# Altium PCB ISL6236A_DEMO_PCB_V1I1.PcbDoc (part 2 of 3)
Units mm, origin at the board's own origin, x right, y up, seen from the top; angles counter-clockwise.
Board outline 50 x 50 mm, 6 copper layers (L1, L2, L3, L4, L5, L6), stack 0.816 mm thick; 41 components, 27 nets, 119 pads, 41 vias.
Unrouted connection lines stored in the file: 91.
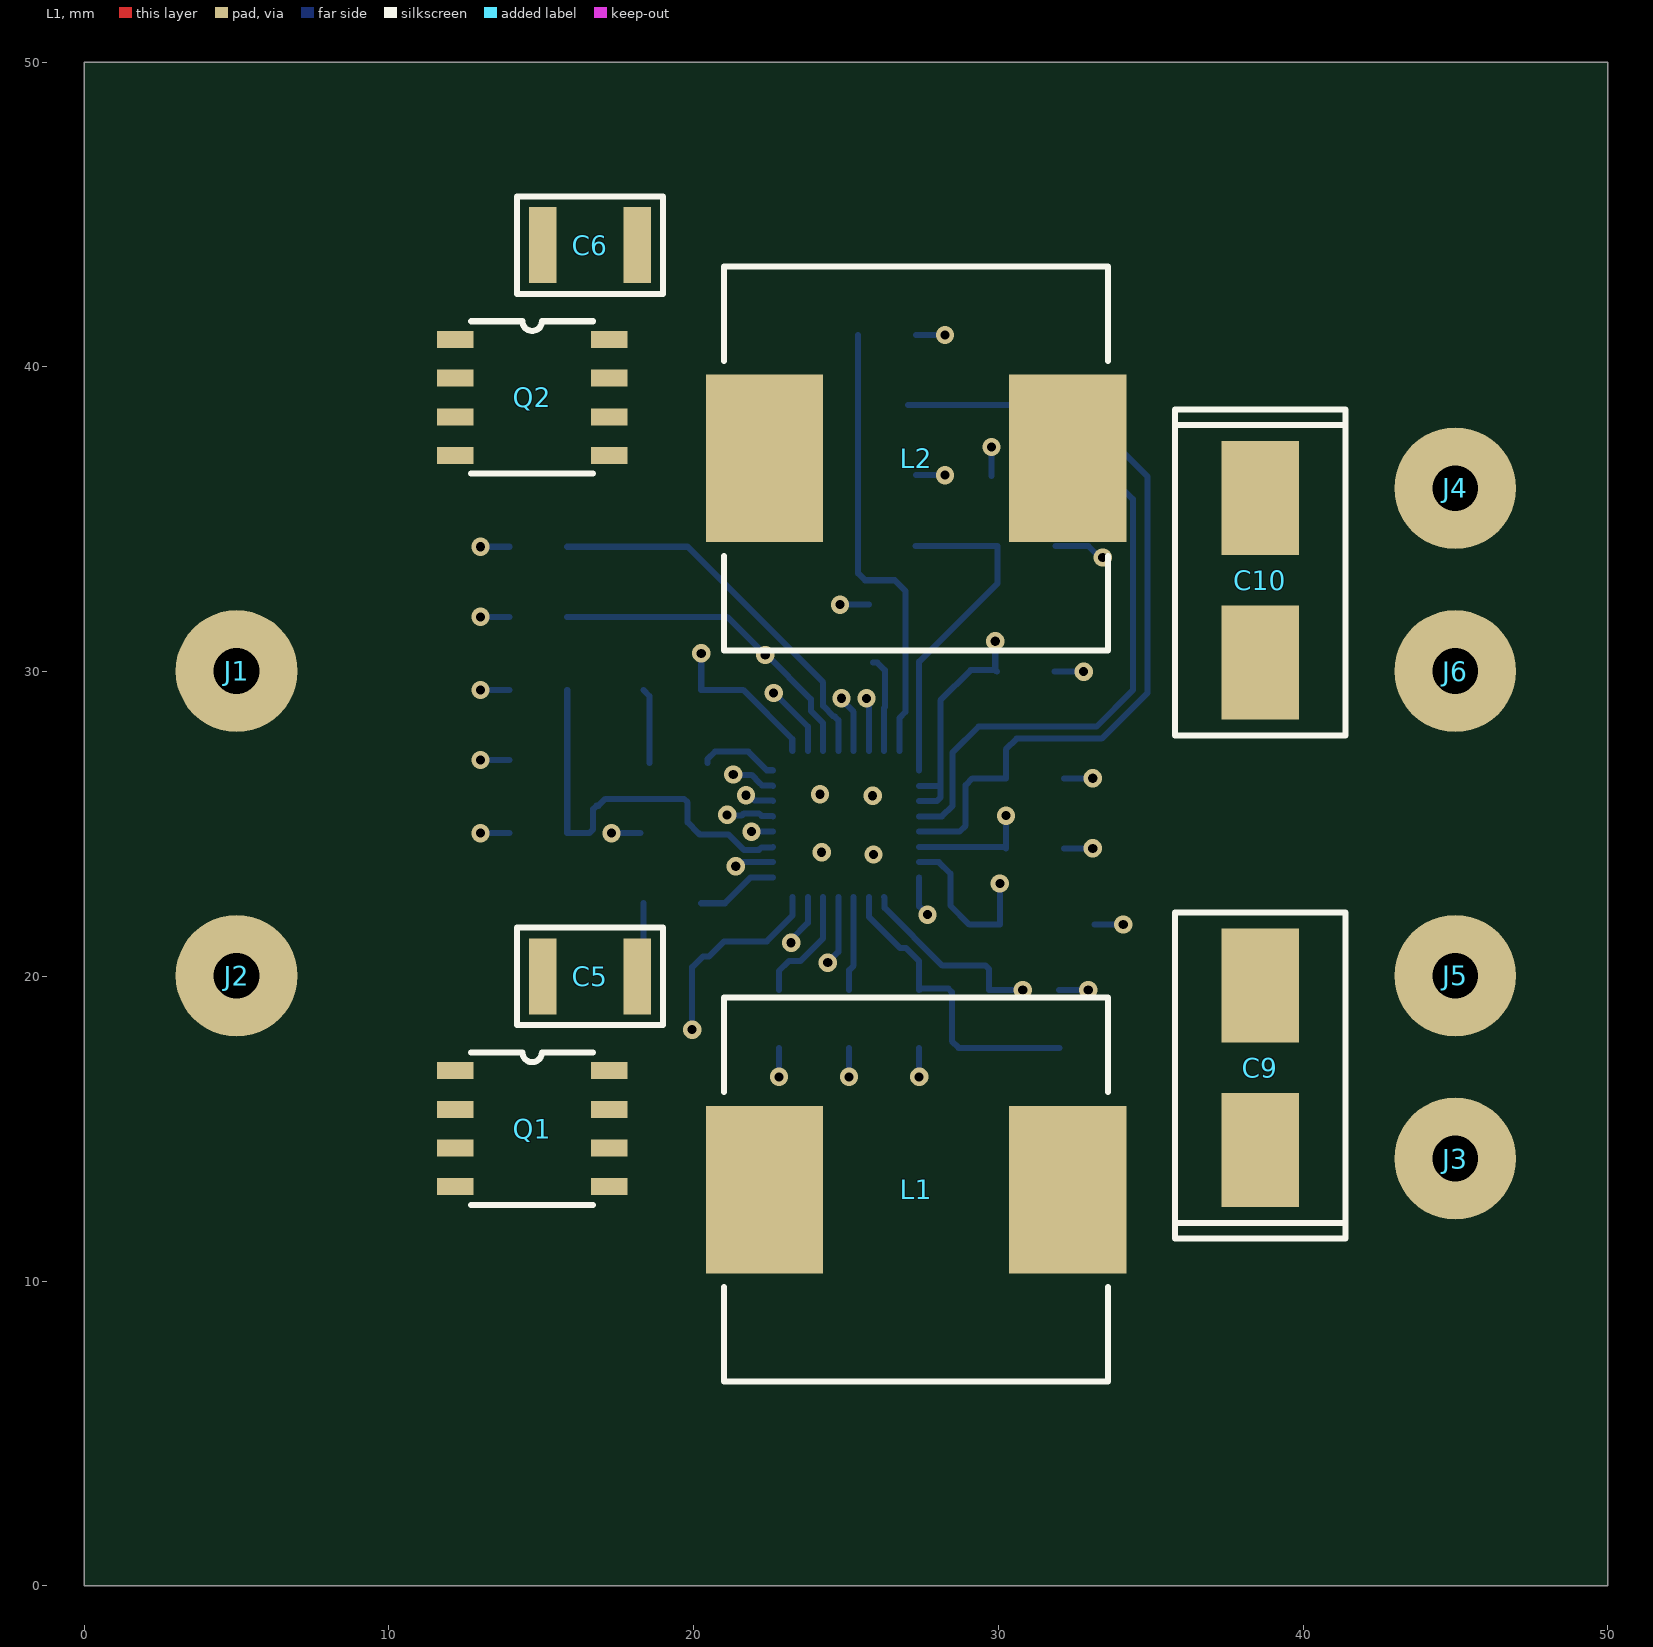
[diagram p0: L1 view]

## Part data (continued)
C11: library part C0805C103K5RACTU, "Multilayer Ceramic Capacitors Mlcc - Smd/Smt 50V 0.01Uf X7R 0805 10%", Case Code (Imperial)=0805, Dielectric=X7R, Dielectric Material=Ceramic, Manufacturer="Yageo Group", Max Operating Temperature=125°C, Min Operating Temperature=-55°C, Supplier Part Number=399-C0805C103K5RACTUCT-ND, Temperature Coefficient=30ppm/°C, Tolerance=10%, Voltage=50V, Case/Package=0805, Category="Ceramic Capacitors", China RoHS=Compliant, ComponentLink1Description=https://datasheet.octopart.com:443/C0805C103K5RACTU-KEMET-datasheet-178445679.pdf?src-supplier=Farnell, ComponentLink1URL=https://datasheet.octopart.com:443/C0805C103K5RACTU-KEMET-datasheet-178445679.pdf?src-supplier=Farnell, ComponentLink2Description=https://datasheet.octopart.com:443/C0805C103K5RACTU-KEMET-datasheet-137357759.pdf?src-supplier=Farnell, ComponentLink2URL=https://datasheet.octopart.com:443/C0805C103K5RACTU-KEMET-datasheet-137357759.pdf?src-supplier=Farnell, ComponentLink3Description=https://datasheet.octopart.com:443/C0805C103K5RACTU-KEMET-datasheet-101576077.pdf?src-supplier=Farnell, ComponentLink3URL=https://datasheet.octopart.com:443/C0805C103K5RACTU-KEMET-datasheet-101576077.pdf?src-supplier=Farnell, ComponentLink4Description=https://datasheet.octopart.com:443/C0805C103K5RACTU-KEMET-datasheet-176142291.pdf?src-supplier=Farnell, ComponentLink4URL=https://datasheet.octopart.com:443/C0805C103K5RACTU-KEMET-datasheet-176142291.pdf?src-supplier=Farnell, ComponentLink5Description=https://datasheet.octopart.com:443/C0805C103K5RAC-TU-Kemet-datasheet-7833651.pdf?src-supplier=Farnell, ComponentLink5URL=https://datasheet.octopart.com:443/C0805C103K5RAC-TU-Kemet-datasheet-7833651.pdf?src-supplier=Farnell, ComponentLink6Description=https://datasheet.octopart.com:443/C0805C103K5RAC-TU-Kemet-datasheet-7601896.pdf?src-supplier=Farnell, ComponentLink6URL=https://datasheet.octopart.com:443/C0805C103K5RAC-TU-Kemet-datasheet-7601896.pdf?src-supplier=Farnell, ComponentLink7Description=https://datasheet.octopart.com:443/C0805C103K5RAC-TU-Kemet-datasheet-5316294.pdf?src-supplier=Farnell, ComponentLink7URL=https://datasheet.octopart.com:443/C0805C103K5RAC-TU-Kemet-datasheet-5316294.pdf?src-supplier=Farnell, ComponentLink8Description=https://datasheet.octopart.com:443/C0805C103K5RAC-TU-Kemet-datasheet-5314837.pdf?src-supplier=Farnell, ComponentLink8URL=https://datasheet.octopart.com:443/C0805C103K5RAC-TU-Kemet-datasheet-5314837.pdf?src-supplier=Farnell, ComponentLink9Description=https://datasheet.octopart.com:443/C0805C103K5RAC-TU-Kemet-datasheet-8092359.pdf?src-supplier=Farnell, ComponentLink9URL=https://datasheet.octopart.com:443/C0805C103K5RAC-TU-Kemet-datasheet-8092359.pdf?src-supplier=Farnell, ComponentLink10Description=https://datasheet.octopart.com:443/C0805C103K5RAC-TU-Kemet-datasheet-5314449.pdf?src-supplier=Farnell, ComponentLink10URL=https://datasheet.octopart.com:443/C0805C103K5RAC-TU-Kemet-datasheet-5314449.pdf?src-supplier=Farnell, ComponentLink11Description=https://datasheet.octopart.com:443/C0805C103K5RACTU-Kemet-datasheet-5314969.pdf?src-supplier=Farnell, ComponentLink11URL=https://datasheet.octopart.com:443/C0805C103K5RACTU-Kemet-datasheet-5314969.pdf?src-supplier=Farnell, ComponentLink12Description=https://datasheet.octopart.com:443/C0805C103K5RAC-TU-Kemet-datasheet-5314627.pdf?src-supplier=Farnell, ComponentLink12URL=https://datasheet.octopart.com:443/C0805C103K5RAC-TU-Kemet-datasheet-5314627.pdf?src-supplier=Farnell, ComponentLink13Description=https://datasheet.octopart.com:443/C0805C103K5RAC-TU-Kemet-datasheet-5389132.pdf?src-supplier=Farnell, ComponentLink13URL=https://datasheet.octopart.com:443/C0805C103K5RAC-TU-Kemet-datasheet-5389132.pdf?src-supplier=Farnell, ComponentLink14Description=https://datasheet.octopart.com:443/C0805C103K5RAC-TU-Kemet-datasheet-5313836.pdf?src-supplier=Farnell, ComponentLink14URL=https://datasheet.octopart.com:443/C0805C103K5RAC-TU-Kemet-datasheet-5313836.pdf?src-supplier=Farnell, ComponentLink15Description=https://datasheet.octopart.com:443/C0805C103K5RAC-TU-Kemet-datasheet-8111010.pdf?src-supplier=Farnell, ComponentLink15URL=https://datasheet.octopart.com:443/C0805C103K5RAC-TU-Kemet-datasheet-8111010.pdf?src-supplier=Farnell, ComponentLink16Description=https://datasheet.octopart.com:443/C0805C103K5RAC-TU-Kemet-datasheet-7627733.pdf?src-supplier=Farnell, ComponentLink16URL=https://datasheet.octopart.com:443/C0805C103K5RAC-TU-Kemet-datasheet-7627733.pdf?src-supplier=Farnell, ComponentLink17Description=https://datasheet.octopart.com:443/C0805C103K5RACTU-Kemet-datasheet-500041.pdf?src-supplier=Farnell, ComponentLink17URL=https://datasheet.octopart.com:443/C0805C103K5RACTU-Kemet-datasheet-500041.pdf?src-supplier=Farnell, ComponentLink18Description=https://datasheet.octopart.com:443/C0805C103K5RAC-TU-Kemet-datasheet-5315946.pdf?src-supplier=Farnell, ComponentLink18URL=https://datasheet.octopart.com:443/C0805C103K5RAC-TU-Kemet-datasheet-5315946.pdf?src-supplier=Farnell, ComponentLink19Description=https://datasheet.octopart.com:443/C0805C103K5RACTU-KEMET-datasheet-182041101.pdf?src-supplier=IHS, ComponentLink19URL=https://datasheet.octopart.com:443/C0805C103K5RACTU-KEMET-datasheet-182041101.pdf?src-supplier=IHS, ComponentLink20Description=https://datasheet.octopart.com:443/C0805C103K5RACTU-KEMET-datasheet-68331921.pdf?src-supplier=Upverter, ComponentLink20URL=https://datasheet.octopart.com:443/C0805C103K5RACTU-KEMET-datasheet-68331921.pdf?src-supplier=Upverter, ComponentLink21Description=https://datasheet.octopart.com:443/C0805C103K5RAC-TU-Kemet-datasheet-5313890.pdf?src-supplier=Newark, ComponentLink21URL=https://datasheet.octopart.com:443/C0805C103K5RAC-TU-Kemet-datasheet-5313890.pdf?src-supplier=Newark, ComponentLink22Description=https://datasheet.octopart.com:443/C0805C103K5RACTU-KEMET-datasheet-130256537.pdf?src-supplier=Newark, ComponentLink22URL=https://datasheet.octopart.com:443/C0805C103K5RACTU-KEMET-datasheet-130256537.pdf?src-supplier=Newark, ComponentLink23Description=https://datasheet.octopart.com:443/C0805C103K5RAC-TU-Kemet-datasheet-5390537.pdf?src-supplier=Newark, ComponentLink23URL=https://datasheet.octopart.com:443/C0805C103K5RAC-TU-Kemet-datasheet-5390537.pdf?src-supplier=Newark, ComponentLink24Description=https://datasheet.octopart.com:443/C0805C103K5RAC-TU-Kemet-datasheet-7541751.pdf?src-supplier=Newark, ComponentLink24URL=https://datasheet.octopart.com:443/C0805C103K5RAC-TU-Kemet-datasheet-7541751.pdf?src-supplier=Newark, ComponentLink25Description=https://datasheet.octopart.com:443/C0805C103K5RACTU-KEMET-datasheet-176142293.pdf?src-supplier=Newark, ComponentLink25URL=https://datasheet.octopart.com:443/C0805C103K5RACTU-KEMET-datasheet-176142293.pdf?src-supplier=Newark, ComponentLink26Description=https://datasheet.octopart.com:443/C0805C103K5RACTU-Kemet-datasheet-27203261.pdf?src-supplier=Newark, ComponentLink26URL=https://datasheet.octopart.com:443/C0805C103K5RACTU-Kemet-datasheet-27203261.pdf?src-supplier=Newark, ComponentLink27Description=https://datasheet.octopart.com:443/C0805C103K5RACTU-Kemet-datasheet-8764837.pdf?src-supplier=Newark, ComponentLink27URL=https://datasheet.octopart.com:443/C0805C103K5RACTU-Kemet-datasheet-8764837.pdf?src-supplier=Newark, ComponentLink28Description=https://datasheet.octopart.com:443/C0805C103K5RACTU-Kemet-datasheet-8480123.pdf?src-supplier=Newark, ComponentLink28URL=https://datasheet.octopart.com:443/C0805C103K5RACTU-Kemet-datasheet-8480123.pdf?src-supplier=Newark, ComponentLink29Description=https://datasheet.octopart.com:443/C0805C103K5RACTU-Kemet-datasheet-5393970.pdf?src-supplier=Newark, ComponentLink29URL=https://datasheet.octopart.com:443/C0805C103K5RACTU-Kemet-datasheet-5393970.pdf?src-supplier=Newark, ComponentLink30Description=https://datasheet.octopart.com:443/C0805C103K5RACTU-Kemet-datasheet-8502025.pdf?src-supplier=Newark, ComponentLink30URL=https://datasheet.octopart.com:443/C0805C103K5RACTU-Kemet-datasheet-8502025.pdf?src-supplier=Newark, ComponentLink31Description=https://datasheet.octopart.com:443/C0805C103K5RACTU-Kemet-datasheet-161801.pdf?src-supplier=Newark, ComponentLink31URL=https://datasheet.octopart.com:443/C0805C103K5RACTU-Kemet-datasheet-161801.pdf?src-supplier=Newark, ComponentLink32Description=https://datasheet.octopart.com:443/C0805C103K5RAC7800-KEMET-datasheet-37550250.pdf?src-supplier=Electro+Sonic, ComponentLink32URL=https://datasheet.octopart.com:443/C0805C103K5RAC7800-KEMET-datasheet-37550250.pdf?src-supplier=Electro+Sonic, ComponentLink33Description=https://datasheet.octopart.com:443/C0805C103K5RACTU-KEMET-datasheet-32036385.pdf?src-supplier=Electro+Sonic, ComponentLink33URL=https://datasheet.octopart.com:443/C0805C103K5RACTU-KEMET-datasheet-32036385.pdf?src-supplier=Electro+Sonic, ComponentLink34Description=https://datasheet.octopart.com:443/C0805C103K5RAC7800-KEMET-datasheet-188512054.pdf?src-supplier=ODG+(Origin+Data+Global), ComponentLink34URL=https://datasheet.octopart.com:443/C0805C103K5RAC7800-KEMET-datasheet-188512054.pdf?src-supplier=ODG+(Origin+Data+Global), ComponentLink35Description=https://datasheet.octopart.com:443/C0805C103K5RACTU-KEMET-datasheet-178249621.pdf?src-supplier=Master+Electronics, ComponentLink35URL=https://datasheet.octopart.com:443/C0805C103K5RACTU-KEMET-datasheet-178249621.pdf?src-supplier=Master+Electronics, ComponentLink36Description=https://datasheet.octopart.com:443/C0805C103K5RACTU-KEMET-datasheet-164512540.pdf?src-supplier=TME, ComponentLink36URL=https://datasheet.octopart.com:443/C0805C103K5RACTU-KEMET-datasheet-164512540.pdf?src-supplier=TME, ComponentLink37Description=https://datasheet.octopart.com:443/C0805C103K5RACTU-KEMET-datasheet-67847103.pdf?src-supplier=TME, ComponentLink37URL=https://datasheet.octopart.com:443/C0805C103K5RACTU-KEMET-datasheet-67847103.pdf?src-supplier=TME, ComponentLink38Description=https://datasheet.octopart.com:443/C0805C103K5RACTU-KEMET-datasheet-68331906.pdf?src-supplier=TME, ComponentLink38URL=https://datasheet.octopart.com:443/C0805C103K5RACTU-KEMET-datasheet-68331906.pdf?src-supplier=TME, ComponentLink39Description=https://datasheet.octopart.com:443/C0805C103K5RACTU-KEMET-datasheet-110724412.pdf?src-supplier=RS+(Formerly+Allied+Electronics), ComponentLink39URL=https://datasheet.octopart.com:443/C0805C103K5RACTU-KEMET-datasheet-110724412.pdf?src-supplier=RS+(Formerly+Allied+Electronics), ComponentLink40Description=https://datasheet.octopart.com:443/C0805C103K5RACTU-Kemet-datasheet-464.pdf?src-supplier=RS+(Formerly+Allied+Electronics), ComponentLink40URL=https://datasheet.octopart.com:443/C0805C103K5RACTU-Kemet-datasheet-464.pdf?src-supplier=RS+(Formerly+Allied+Electronics), ComponentLink41Description=https://datasheet.octopart.com/C0805C103K5RACTU-KEMET-datasheet-84169754.pdf, ComponentLink41URL=https://datasheet.octopart.com/C0805C103K5RACTU-KEMET-datasheet-84169754.pdf, ComponentLink42Description=https://datasheet.octopart.com:443/C0805C103K5RACTU-Kemet-datasheet-24570007.pdf?src-supplier=element14+APAC, ComponentLink42URL=https://datasheet.octopart.com:443/C0805C103K5RACTU-Kemet-datasheet-24570007.pdf?src-supplier=element14+APAC, ComponentLink43Description=https://datasheet.octopart.com:443/C0805C103K5RACTU-Kemet-datasheet-22084244.pdf?src-supplier=element14+APAC, ComponentLink43URL=https://datasheet.octopart.com:443/C0805C103K5RACTU-Kemet-datasheet-22084244.pdf?src-supplier=element14+APAC, ComponentLink44Description=https://datasheet.octopart.com:443/C0805C103K5RACTU-Kemet-datasheet-11974838.pdf?src-supplier=Arrow+Electronics, ComponentLink44URL=https://datasheet.octopart.com:443/C0805C103K5RACTU-Kemet-datasheet-11974838.pdf?src-supplier=Arrow+Electronics, ComponentLink45Description=http://sigma.octopart.com:80/conflict_mineral_statement/Yageo-company-3.pdf?src-supplier=Compliance+Statements, ComponentLink45URL=http://sigma.octopart.com:80/conflict_mineral_statement/Yageo-company-3.pdf?src-supplier=Compliance+Statements, ComponentLink46Description=http://sigma.octopart.com:80/rohs_statement/Yageo-company-2.pdf?src-supplier=Compliance+Statements, ComponentLink46URL=http://sigma.octopart.com:80/rohs_statement/Yageo-company-2.pdf?src-supplier=Compliance+Statements, Country of Origin="Mainland China", Depth=1.25mm, Export Control Classification Number (ECCN) Code=EAR99, Harmonized Tariff Schedule (HTS) Code=8532.24.00.20, Height=780µm, Introduction Date=2012-12-07, Lead Free="Lead Free", Lead Pitch=750µm, Length=2mm, Lifecycle Status=Production, Manufacturer Part Number=C0805C103K5RACTU, Material=Ceramic, Mounting Technology="Surface Mount", Number of Terminals=2, Packaging="Cut Tape", Pins=2, Pricing="1=0.11, 10=0.06, 50=0.0416, 100=0.036, 500=0.02644, 1000=0.02351 (USD)", Radiation Hardening=No, REACH SVHC=Yes, RoHS=Compliant, Schedule B="8532240020, 8532240020|8532240020|8532240020|8532240020|8532240020, 8532240020|8532240020|8532240020|8532240020|8532240020|8532240020, 8532240020|8532240020|8532240020|8532240020|8532240020|8532240020|8532240020", Stock=1722319, Supplier=DigiKey, Termination=SMD/SMT, Thickness=889µm, Voltage Rating=50V, Voltage Rating (AC)=50V, Voltage Rating (DC)=50V, Width=1.25mm
J1 J2 J3 J4 J5 J6: library part PAD_WITH_HOLE_4MM_1MM5, "pad with a hole 4mm x 1.5mm"
L1: library part DR125-3R3-R, "Inductor Power Shielded Drum Core 3.3uH 20% 100KHz Ferrite 9.26A 6.3mOhm DCR T/R", Case/Package=0125, Current Rating=9.26A, DC Resistance (DCR)=6.3mΩ, Inductance Tolerance=20%, Manufacturer=Eaton, Max Operating Temperature=125°C, Min Operating Temperature=-40°C, Saturation Current=12.7A, Self Resonant Frequency=100kHz, Supplier Part Number=513-1529-1-ND, Category="Fixed Inductors", ComponentLink1Description=https://datasheet.octopart.com:443/DR125-3R3-R-Eaton-datasheet-129252529.pdf?src-supplier=Electro+Sonic, ComponentLink1URL=https://datasheet.octopart.com:443/DR125-3R3-R-Eaton-datasheet-129252529.pdf?src-supplier=Electro+Sonic, ComponentLink2Description=https://datasheet.octopart.com:443/DR125-3R3-R-Eaton-datasheet-41175520.pdf?src-supplier=Master+Electronics, ComponentLink2URL=https://datasheet.octopart.com:443/DR125-3R3-R-Eaton-datasheet-41175520.pdf?src-supplier=Master+Electronics, ComponentLink3Description=https://datasheet.octopart.com:443/DR125-3R3-R-Coiltronics-datasheet-8612520.pdf?src-supplier=IHS, ComponentLink3URL=https://datasheet.octopart.com:443/DR125-3R3-R-Coiltronics-datasheet-8612520.pdf?src-supplier=IHS, ComponentLink4Description=https://datasheet.octopart.com:443/DR125-3R3-R-Eaton-datasheet-552538.pdf?src-supplier=Newark, ComponentLink4URL=https://datasheet.octopart.com:443/DR125-3R3-R-Eaton-datasheet-552538.pdf?src-supplier=Newark, ComponentLink5Description=https://datasheet.octopart.com:443/DR125-3R3-R-Coiltronics-datasheet-3395.pdf?src-supplier=Factory+Futures, ComponentLink5URL=https://datasheet.octopart.com:443/DR125-3R3-R-Coiltronics-datasheet-3395.pdf?src-supplier=Factory+Futures, ComponentLink6Description=https://datasheet.octopart.com:443/DR125-3R3-R-Eaton-datasheet-37490916.pdf?src-supplier=RS+(Formerly+Allied+Electronics), ComponentLink6URL=https://datasheet.octopart.com:443/DR125-3R3-R-Eaton-datasheet-37490916.pdf?src-supplier=RS+(Formerly+Allied+Electronics), ComponentLink7Description=https://datasheet.octopart.com:443/DR125-3R3-R-Coiltronics-datasheet-119352.pdf?src-supplier=DigiKey, ComponentLink7URL=https://datasheet.octopart.com:443/DR125-3R3-R-Coiltronics-datasheet-119352.pdf?src-supplier=DigiKey, Composition=Wirewound, Core Material=Ferrite, Country of Origin=Philippines, Depth=12.5mm, Export Control Classification Number (ECCN) Code=EAR99, Harmonized Tariff Schedule (HTS) Code=8504.50.80.00, Height=6mm, Height - Seated (Max)=5.9944mm, Introduction Date=2005-07-20, Lead Free="Lead Free", Length=12.5mm, Lifecycle Status=Production, Manufacturer Part Number=DR125-3R3-R, Max Current Rating=9.26A, Max DC Current=9.26A, Military Standard=Not, Mounting Technology="Surface Mount", Number of Circuits=1, Number of Terminals=2, Pins=2, Pricing="1=0.98, 10=0.803, 100=0.6606 (USD)", Radiation Hardening=No, REACH SVHC=No, RMS Current (Irms)=9.26A, RoHS=Compliant, Schedule B="8504500000, 8504500000|8504500000|8504500000|8504500000|8504500000|8504500000|8504500000|8504500000|8504500000|8504500000|8504500000|8504500000|8504500000|8504500000|8504500000|8504500000|8504500000|8504500000|8504500000|8504500000|8504500000|8504500000|8504500000|85", Shielding=Shielded, Stock=12331, Supplier=DigiKey, Termination=SMD/SMT, Test Frequency=100kHz, Tolerance=20%, Weight=4.082331g, Width=12.5mm
L2: library part DR125-2R2-R, "Inductor Power Shielded Drum Core 2.2uH 20% 100KHz Ferrite 10.9A 4.5mOhm DCR T/R", Case/Package=Nonstandard, Current Rating=10.9A, DC Resistance (DCR)=4.5mΩ, Inductance Tolerance=20%, Manufacturer=Eaton, Max Operating Temperature=125°C, Min Operating Temperature=-40°C, Saturation Current=15A, Self Resonant Frequency=100kHz, Supplier Part Number=513-1662-1-ND, Category="Fixed Inductors", China RoHS=Compliant, ComponentLink1Description=https://datasheet.octopart.com:443/DR125-2R2-R-Eaton-datasheet-129252529.pdf?src-supplier=Electro+Sonic, ComponentLink1URL=https://datasheet.octopart.com:443/DR125-2R2-R-Eaton-datasheet-129252529.pdf?src-supplier=Electro+Sonic, ComponentLink2Description=https://datasheet.octopart.com:443/DR125-2R2-R-Eaton-datasheet-41175520.pdf?src-supplier=Master+Electronics, ComponentLink2URL=https://datasheet.octopart.com:443/DR125-2R2-R-Eaton-datasheet-41175520.pdf?src-supplier=Master+Electronics, ComponentLink3Description=https://datasheet.octopart.com:443/DR125-2R2-R-Coiltronics-datasheet-8612520.pdf?src-supplier=IHS, ComponentLink3URL=https://datasheet.octopart.com:443/DR125-2R2-R-Coiltronics-datasheet-8612520.pdf?src-supplier=IHS, ComponentLink4Description=https://datasheet.octopart.com:443/DR125-2R2-R-Eaton-datasheet-552538.pdf?src-supplier=Newark, ComponentLink4URL=https://datasheet.octopart.com:443/DR125-2R2-R-Eaton-datasheet-552538.pdf?src-supplier=Newark, ComponentLink5Description=https://datasheet.octopart.com:443/DR125-2R2-R-Coiltronics-datasheet-3395.pdf?src-supplier=Factory+Futures, ComponentLink5URL=https://datasheet.octopart.com:443/DR125-2R2-R-Coiltronics-datasheet-3395.pdf?src-supplier=Factory+Futures, ComponentLink6Description=https://datasheet.octopart.com:443/DR125-2R2-R-Eaton-datasheet-37490916.pdf?src-supplier=RS+(Formerly+Allied+Electronics), ComponentLink6URL=https://datasheet.octopart.com:443/DR125-2R2-R-Eaton-datasheet-37490916.pdf?src-supplier=RS+(Formerly+Allied+Electronics), ComponentLink7Description=https://datasheet.octopart.com:443/DR125-2R2-R-Coiltronics-datasheet-119352.pdf?src-supplier=DigiKey, ComponentLink7URL=https://datasheet.octopart.com:443/DR125-2R2-R-Coiltronics-datasheet-119352.pdf?src-supplier=DigiKey, Composition=Wirewound, Core Material=Ferrite, Country of Origin=Philippines, DC Current=10.9A, Depth=12.5mm, Export Control Classification Number (ECCN) Code=EAR99, Harmonized Tariff Schedule (HTS) Code=8504.50.80.00, Height=6mm, Height - Seated (Max)=5.9944mm, Introduction Date=2005-07-20, Lead Free="Lead Free", Length=12.5mm, Lifecycle Status=Production, Manufacturer Part Number=DR125-2R2-R, Max Current Rating=10.9A, Max DC Current=10.9A, Military Standard=Not, Mounting Technology="Surface Mount", Number of Circuits=1, Number of Terminals=2, Packaging="Cut Tape", Pins=2, Pricing="1=0.83, 10=0.685, 100=0.563 (USD)", Radiation Hardening=No, REACH SVHC=No, RMS Current (Irms)=10.9A, RoHS=Compliant, Shielding=Shielded, Stock=226, Supplier=DigiKey, Termination=SMD/SMT, Test Frequency=100kHz, Tolerance=20%, Weight=4.082331g, Width=12.5mm
Q1 Q2: "Transistor MOSFET Array Dual N-CH 30V 5.8A/8.2A 8-Pin SOIC T/R", Case/Package=SO, Continuous Drain Current (ID)=5.8A, Drain to Source Resistance=18.5mΩ, Drain to Source Voltage (Vdss)=30V, Gate to Source Voltage (Vgs)=20V, Manufacturer=Vishay, Max Junction Temperature (Tj)=150°C, Max Power Dissipation=1W, Min Operating Temperature=-55°C, Supplier Part Number=SI4816BDY-T1-E3CT-ND, Threshold Voltage=1V, Category=MOSFETs, China RoHS=Compliant, ComponentLink1Description=https://datasheet.octopart.com:443/SI4816BDY-T1-E3-Vishay-datasheet-181471835.pdf?src-supplier=Farnell, ComponentLink1URL=https://datasheet.octopart.com:443/SI4816BDY-T1-E3-Vishay-datasheet-181471835.pdf?src-supplier=Farnell, ComponentLink2Description=https://datasheet.octopart.com:443/SI4816BDY-T1-E3-Vishay-datasheet-8703106.pdf?src-supplier=element14+APAC, ComponentLink2URL=https://datasheet.octopart.com:443/SI4816BDY-T1-E3-Vishay-datasheet-8703106.pdf?src-supplier=element14+APAC, ComponentLink3Description=https://datasheet.octopart.com:443/SI4816BDY-T1-E3-Vishay-datasheet-11047461.pdf?src-supplier=element14+APAC, ComponentLink3URL=https://datasheet.octopart.com:443/SI4816BDY-T1-E3-Vishay-datasheet-11047461.pdf?src-supplier=element14+APAC, ComponentLink4Description=https://datasheet.octopart.com:443/SI4816BDY-T1-E3-Vishay-datasheet-8332786.pdf?src-supplier=element14+APAC, ComponentLink4URL=https://datasheet.octopart.com:443/SI4816BDY-T1-E3-Vishay-datasheet-8332786.pdf?src-supplier=element14+APAC, ComponentLink5Description=https://datasheet.octopart.com:443/SI4816BDY-T1-E3-Vishay-datasheet-31978687.pdf?src-supplier=element14+APAC, ComponentLink5URL=https://datasheet.octopart.com:443/SI4816BDY-T1-E3-Vishay-datasheet-31978687.pdf?src-supplier=element14+APAC, ComponentLink6Description=https://datasheet.octopart.com:443/SI4816BDY-T1-E3-Vishay-datasheet-181482347.pdf?src-supplier=IHS, ComponentLink6URL=https://datasheet.octopart.com:443/SI4816BDY-T1-E3-Vishay-datasheet-181482347.pdf?src-supplier=IHS, ComponentLink7Description=https://datasheet.octopart.com:443/SI4816BDY-T1-E3-Vishay-datasheet-62318721.pdf?src-supplier=Newark, ComponentLink7URL=https://datasheet.octopart.com:443/SI4816BDY-T1-E3-Vishay-datasheet-62318721.pdf?src-supplier=Newark, ComponentLink8Description=https://datasheet.octopart.com:443/SI4816BDY-T1-E3-Vishay-datasheet-41341409.pdf?src-supplier=Newark, ComponentLink8URL=https://datasheet.octopart.com:443/SI4816BDY-T1-E3-Vishay-datasheet-41341409.pdf?src-supplier=Newark, ComponentLink9Description=https://datasheet.octopart.com:443/SI4816BDY-T1-E3-Vishay-datasheet-141196160.pdf?src-supplier=TME, ComponentLink9URL=https://datasheet.octopart.com:443/SI4816BDY-T1-E3-Vishay-datasheet-141196160.pdf?src-supplier=TME, ComponentLink10Description=https://datasheet.octopart.com:443/SI4816BDY-T1-E3-Vishay-datasheet-14187004.pdf?src-supplier=iiiC, ComponentLink10URL=https://datasheet.octopart.com:443/SI4816BDY-T1-E3-Vishay-datasheet-14187004.pdf?src-supplier=iiiC, ComponentLink11Description=https://datasheet.octopart.com:443/SI4816BDY-T1-E3-Vishay-datasheet-11890201.pdf?src-supplier=Arrow+Electronics, ComponentLink11URL=https://datasheet.octopart.com:443/SI4816BDY-T1-E3-Vishay-datasheet-11890201.pdf?src-supplier=Arrow+Electronics, ComponentLink12Description=http://sigma.octopart.com:80/rohs_statement/Vishay-company-15.pdf?src-supplier=Compliance+Statements, ComponentLink12URL=http://sigma.octopart.com:80/rohs_statement/Vishay-company-15.pdf?src-supplier=Compliance+Statements, Element Configuration=Single, Export Control Classification Number (ECCN) Code=EAR99, Fall Time=9ns, Height=1.75mm, Introduction Date=2004-10-28, Lead Free="Lead Free", Length=5mm, Lifecycle Status=Production, Manufacturer Part Number=SI4816BDY-T1-E3, Max Operating Temperature=150°C, Min Breakdown Voltage=30V, Mounting Technology="Surface Mount", Nominal Vgs=3V, Number of Channels=2, Number of Elements=2, Number of Terminals=8, Pins=8, Pricing="1=2.53, 10=1.627, 100=1.1094, 500=0.88782, 1000=0.81657 (USD)", Radiation Hardening=No, Rds On Max=18.5mΩ, REACH SVHC=Yes, Rise Time=9ns, RoHS=Compliant, Schedule B="8541290080, 8541290080|8541290080|8541290080|8541290080|8541290080", Stock=2831, Supplier=DigiKey, Turn-Off Delay Time=31ns, Turn-On Delay Time=13ns, Weight=186.993455mg, Width=4mm
R1 R2 R13 R15: library part AC0805JR-070RL, "Zero Ohm Resistor, Jumper, 0805 [2012 Metric], Thick Film, 125 mW, 2 A, Surface Mount Device", Case Code (Imperial)=0805, Case Code (Metric)=2012, Manufacturer="Yageo Group", Manufacturer Package Identifier="0805 (2012 metric)", Max Operating Temperature=155°C, Max Power Dissipation=125mW, Min Operating Temperature=-55°C, Ratings=AEC-Q200, Supplier Part Number=YAG3755CT-ND, Temperature Coefficient=200ppm/°C, Tolerance=5%, Voltage Rating=150V, Case/Package=0805, Category="Chip SMD Resistors", China RoHS=Non-Compliant, ComponentLink1Description=https://datasheet.octopart.com:443/AC0805JR-070RL-Yageo-datasheet-176385416.pdf?src-supplier=IHS, ComponentLink1URL=https://datasheet.octopart.com:443/AC0805JR-070RL-Yageo-datasheet-176385416.pdf?src-supplier=IHS, ComponentLink2Description=https://datasheet.octopart.com:443/AC0805JR-070RL-Yageo-datasheet-151884373.pdf?src-supplier=Future+Electronics, ComponentLink2URL=https://datasheet.octopart.com:443/AC0805JR-070RL-Yageo-datasheet-151884373.pdf?src-supplier=Future+Electronics, ComponentLink3Description=https://datasheet.octopart.com:443/AC0805JR-070RL-Yageo-datasheet-166720450.pdf?src-supplier=Future+Electronics, ComponentLink3URL=https://datasheet.octopart.com:443/AC0805JR-070RL-Yageo-datasheet-166720450.pdf?src-supplier=Future+Electronics, ComponentLink4Description=https://datasheet.octopart.com:443/AC0805JR-070RL-Yageo-datasheet-137699919.pdf?src-supplier=Future+Electronics, ComponentLink4URL=https://datasheet.octopart.com:443/AC0805JR-070RL-Yageo-datasheet-137699919.pdf?src-supplier=Future+Electronics, ComponentLink5Description=https://datasheet.octopart.com:443/AC0805JR-070RL-Yageo-datasheet-83209224.pdf?src-supplier=Future+Electronics, ComponentLink5URL=https://datasheet.octopart.com:443/AC0805JR-070RL-Yageo-datasheet-83209224.pdf?src-supplier=Future+Electronics, ComponentLink6Description=https://datasheet.octopart.com:443/AC0805JR-070RL-Yageo-datasheet-62139191.pdf?src-supplier=Future+Electronics, ComponentLink6URL=https://datasheet.octopart.com:443/AC0805JR-070RL-Yageo-datasheet-62139191.pdf?src-supplier=Future+Electronics, ComponentLink7Description=https://sigma.octopart.com:443/138820526/technical_drawing/Yageo-AC0805JR-070RL.pdf?src-supplier=Upverter, ComponentLink7URL=https://sigma.octopart.com:443/138820526/technical_drawing/Yageo-AC0805JR-070RL.pdf?src-supplier=Upverter, ComponentLink8Description=https://datasheet.octopart.com:443/AC0805JR-070RL-Yageo-Group-datasheet-164768995.pdf?src-supplier=ODG+(Origin+Data+Global), ComponentLink8URL=https://datasheet.octopart.com:443/AC0805JR-070RL-Yageo-Group-datasheet-164768995.pdf?src-supplier=ODG+(Origin+Data+Global), ComponentLink9Description=https://datasheet.octopart.com/AC0805JR-070RL-Yageo-datasheet-12512238.pdf, ComponentLink9URL=https://datasheet.octopart.com/AC0805JR-070RL-Yageo-datasheet-12512238.pdf, ComponentLink10Description=https://datasheet.octopart.com:443/AC0805JR-070RL-Yageo-Group-datasheet-190384202.pdf?src-supplier=Farnell, ComponentLink10URL=https://datasheet.octopart.com:443/AC0805JR-070RL-Yageo-Group-datasheet-190384202.pdf?src-supplier=Farnell, ComponentLink11Description=http://sigma.octopart.com:80/conflict_mineral_statement/Yageo-company-3.pdf?src-supplier=Compliance+Statements, ComponentLink11URL=http://sigma.octopart.com:80/conflict_mineral_statement/Yageo-company-3.pdf?src-supplier=Compliance+Statements, ComponentLink12Description=http://sigma.octopart.com:80/rohs_statement/Yageo-company-2.pdf?src-supplier=Compliance+Statements, ComponentLink12URL=http://sigma.octopart.com:80/rohs_statement/Yageo-company-2.pdf?src-supplier=Compliance+Statements, Composition="Thick Film", Features="Automotive AEC-Q200, Moisture Resistant", Height=500µm, Lead Free="Lead Free", Length=2mm, Lifecycle Status=Production, Manufacturer Part Number=AC0805JR-070RL, Mounting Technology="Surface Mount", Number of Terminals=2, Number of Terminations=2, Packaging="Tape & Reel", Power Rating=125mW, Pricing="1=0.1, 10=0.019, 25=0.016, 50=0.0138, 100=0.0121, 250=0.01024, 500=0.00902, 1000=0.008 (USD)", REACH SVHC=Yes, RoHS=Compliant, Stock=218115, Supplier=DigiKey, Termination=SMD/SMT, Width=1.25mm
R3: library part AC0805FR-1310RL, "Res Thick Film 0805 10 Ohm 1% 0.125W(1/8W) ±100ppm/C Pad SMD T/R Automotive AEC-Q200", Case/Package=0805, Manufacturer="Yageo Group", Max Operating Temperature=155°C, Min Operating Temperature=-55°C, Power Rating=125mW, Ratings=AEC-Q200, Supplier Part Number=13-AC0805FR-1310RLDKR-ND, Temperature Coefficient=100ppm/°C, Tolerance=1%, Voltage Rating=150V, Category="Chip SMD Resistors", China RoHS=Non-Compliant, ComponentLink1Description=https://datasheet.octopart.com:443/AC0805FR-1310RL-Yageo-datasheet-182189377.pdf?src-supplier=IHS, ComponentLink1URL=https://datasheet.octopart.com:443/AC0805FR-1310RL-Yageo-datasheet-182189377.pdf?src-supplier=IHS, ComponentLink2Description=https://datasheet.octopart.com:443/AC0805FR-1310RL-Yageo-datasheet-83209224.pdf?src-supplier=Upverter, ComponentLink2URL=https://datasheet.octopart.com:443/AC0805FR-1310RL-Yageo-datasheet-83209224.pdf?src-supplier=Upverter, ComponentLink3Description=https://datasheet.octopart.com/AC0805FR-1310RL-Yageo-datasheet-12512238.pdf, ComponentLink3URL=https://datasheet.octopart.com/AC0805FR-1310RL-Yageo-datasheet-12512238.pdf, ComponentLink4Description=http://sigma.octopart.com:80/conflict_mineral_statement/Yageo-company-3.pdf?src-supplier=Compliance+Statements, ComponentLink4URL=http://sigma.octopart.com:80/conflict_mineral_statement/Yageo-company-3.pdf?src-supplier=Compliance+Statements, ComponentLink5Description=http://sigma.octopart.com:80/rohs_statement/Yageo-company-2.pdf?src-supplier=Compliance+Statements, ComponentLink5URL=http://sigma.octopart.com:80/rohs_statement/Yageo-company-2.pdf?src-supplier=Compliance+Statements, Composition="Thick Film", Country of Origin="Mainland China, Taiwan", Export Control Classification Number (ECCN) Code=EAR99, Harmonized Tariff Schedule (HTS) Code=8533.21.00.30, Height=500µm, Introduction Date=2012-04-10, Length=2mm, Lifecycle Status=Production, Manufacturer Part Number=AC0805FR-1310RL, Mounting Technology="Surface Mount", Number of Terminals=2, Packaging="Tape & Reel", Pricing="1=0.12, 10=0.055, 25=0.042, 50=0.035, 100=0.0293, 250=0.02368, 500=0.02046, 1000=0.01791, 5000=0.01387 (USD)", REACH SVHC=Yes, RoHS=Compliant, Stock=19780, Supplier=DigiKey, Width=1.25mm, Working Voltage=150V
R4 R5: library part AC0805FR-071RL, "Res Thick Film 0805 1 Ohm 1% 0.125W(1/8W) ±200ppm/C Pad SMD T/R Automotive AEC-Q200", Case Code (Imperial)=0805, Case Code (Metric)=2012, Manufacturer="Yageo Group", Manufacturer Package Identifier="0805 (2012 metric)", Max Operating Temperature=155°C, Max Power Dissipation=125mW, Min Operating Temperature=-55°C, Ratings=AEC-Q200, Supplier Part Number=YAG3705CT-ND, Temperature Coefficient=200ppm/°C, Tolerance=1%, Voltage Rating=150V, Case/Package=0805, Category="Chip SMD Resistors", China RoHS=Non-Compliant, ComponentLink1Description=https://datasheet.octopart.com:443/AC0805FR-071RL-Yageo-datasheet-182189377.pdf?src-supplier=IHS, ComponentLink1URL=https://datasheet.octopart.com:443/AC0805FR-071RL-Yageo-datasheet-182189377.pdf?src-supplier=IHS, ComponentLink2Description=https://datasheet.octopart.com:443/AC0805FR-071RL-Yageo-datasheet-178509465.pdf?src-supplier=Newark, ComponentLink2URL=https://datasheet.octopart.com:443/AC0805FR-071RL-Yageo-datasheet-178509465.pdf?src-supplier=Newark, ComponentLink3Description=https://datasheet.octopart.com:443/AC0805FR-071RL-Yageo-datasheet-166720450.pdf?src-supplier=JRH+Electronics, ComponentLink3URL=https://datasheet.octopart.com:443/AC0805FR-071RL-Yageo-datasheet-166720450.pdf?src-supplier=JRH+Electronics, ComponentLink4Description=https://datasheet.octopart.com/AC0805FR-071RL-Yageo-datasheet-12512238.pdf, ComponentLink4URL=https://datasheet.octopart.com/AC0805FR-071RL-Yageo-datasheet-12512238.pdf, ComponentLink5Description=https://datasheet.octopart.com:443/AC0805FR-071RL-Yageo-Group-datasheet-188689268.pdf?src-supplier=TME, ComponentLink5URL=https://datasheet.octopart.com:443/AC0805FR-071RL-Yageo-Group-datasheet-188689268.pdf?src-supplier=TME, ComponentLink6Description=https://datasheet.octopart.com:443/AC0805FR-071RL-Yageo-Group-datasheet-164768995.pdf?src-supplier=ODG+(Origin+Data+Global), ComponentLink6URL=https://datasheet.octopart.com:443/AC0805FR-071RL-Yageo-Group-datasheet-164768995.pdf?src-supplier=ODG+(Origin+Data+Global), ComponentLink7Description=https://datasheet.octopart.com:443/AC0805FR-071RL-Yageo-datasheet-151884373.pdf?src-supplier=Future+Electronics, ComponentLink7URL=https://datasheet.octopart.com:443/AC0805FR-071RL-Yageo-datasheet-151884373.pdf?src-supplier=Future+Electronics, ComponentLink8Description=https://datasheet.octopart.com:443/AC0805FR-071RL-Yageo-datasheet-137699919.pdf?src-supplier=Future+Electronics, ComponentLink8URL=https://datasheet.octopart.com:443/AC0805FR-071RL-Yageo-datasheet-137699919.pdf?src-supplier=Future+Electronics, ComponentLink9Description=https://datasheet.octopart.com:443/AC0805FR-071RL-Yageo-datasheet-24580492.pdf?src-supplier=Future+Electronics, ComponentLink9URL=https://datasheet.octopart.com:443/AC0805FR-071RL-Yageo-datasheet-24580492.pdf?src-supplier=Future+Electronics, ComponentLink10Description=https://datasheet.octopart.com:443/AC0805FR-071RL-Yageo-datasheet-13029202.pdf?src-supplier=Future+Electronics, ComponentLink10URL=https://datasheet.octopart.com:443/AC0805FR-071RL-Yageo-datasheet-13029202.pdf?src-supplier=Future+Electronics, ComponentLink11Description=http://sigma.octopart.com:80/conflict_mineral_statement/Yageo-company-3.pdf?src-supplier=Compliance+Statements, ComponentLink11URL=http://sigma.octopart.com:80/conflict_mineral_statement/Yageo-company-3.pdf?src-supplier=Compliance+Statements, ComponentLink12Description=http://sigma.octopart.com:80/rohs_statement/Yageo-company-2.pdf?src-supplier=Compliance+Statements, ComponentLink12URL=http://sigma.octopart.com:80/rohs_statement/Yageo-company-2.pdf?src-supplier=Compliance+Statements, Composition="Thick Film", Features="Automotive AEC-Q200, Moisture Resistant", Height=500µm, Lead Free="Lead Free", Length=2mm, Lifecycle Status=Production, Manufacturer Part Number=AC0805FR-071RL, Mounting Technology="Surface Mount", Number of Terminals=2, Number of Terminations=2, Packaging="Tape & Reel", Power Rating=125mW, Pricing="1=0.12, 10=0.055, 25=0.042, 50=0.035, 100=0.0293, 250=0.02368, 500=0.02046, 1000=0.01791 (USD)", REACH SVHC=Yes, RoHS=Compliant, Schedule B="8533210045, 8533210045|8533210045|8533210045|8533210045|8533210045", Stock=493, Supplier=DigiKey, Termination=SMD/SMT, Weight=5.499807mg, Width=1.25mm, Working Voltage=150V
R6 R7 R9 R10: library part AC0805FR-07200KL, "Res Thick Film 0805 200K Ohm 1% 0.125W(1/8W) ±100ppm/C Pad SMD T/R Automotive AEC-Q200", Case Code (Imperial)=0805, Case Code (Metric)=2012, Manufacturer="Yageo Group", Manufacturer Package Identifier="0805 (2012 metric)", Max Operating Temperature=155°C, Max Power Dissipation=125mW, Min Operating Temperature=-55°C, Ratings=AEC-Q200, Supplier Part Number=YAG3706CT-ND, Temperature Coefficient=100ppm/°C, Tolerance=1%, Voltage Rating=150V, Case/Package=0805, Category="Chip SMD Resistors", China RoHS=Non-Compliant, ComponentLink1Description=https://datasheet.octopart.com:443/AC0805FR-07200KL-Yageo-datasheet-182189377.pdf?src-supplier=IHS, ComponentLink1URL=https://datasheet.octopart.com:443/AC0805FR-07200KL-Yageo-datasheet-182189377.pdf?src-supplier=IHS, ComponentLink2Description=https://datasheet.octopart.com:443/AC0805FR-07200KL-Yageo-datasheet-83209224.pdf?src-supplier=Upverter, ComponentLink2URL=https://datasheet.octopart.com:443/AC0805FR-07200KL-Yageo-datasheet-83209224.pdf?src-supplier=Upverter, ComponentLink3Description=https://datasheet.octopart.com:443/AC0805FR-07200KL-Yageo-datasheet-178509465.pdf?src-supplier=Farnell, ComponentLink3URL=https://datasheet.octopart.com:443/AC0805FR-07200KL-Yageo-datasheet-178509465.pdf?src-supplier=Farnell, ComponentLink4Description=https://datasheet.octopart.com/AC0805FR-07200KL-Yageo-datasheet-12512238.pdf, ComponentLink4URL=https://datasheet.octopart.com/AC0805FR-07200KL-Yageo-datasheet-12512238.pdf, ComponentLink5Description=https://datasheet.octopart.com:443/AC0805FR-07200KL-Yageo-Group-datasheet-193561750.pdf?src-supplier=element14+APAC, ComponentLink5URL=https://datasheet.octopart.com:443/AC0805FR-07200KL-Yageo-Group-datasheet-193561750.pdf?src-supplier=element14+APAC, ComponentLink6Description=https://datasheet.octopart.com:443/AC0805FR-07200KL-Yageo-datasheet-166720450.pdf?src-supplier=Future+Electronics, ComponentLink6URL=https://datasheet.octopart.com:443/AC0805FR-07200KL-Yageo-datasheet-166720450.pdf?src-supplier=Future+Electronics, ComponentLink7Description=https://datasheet.octopart.com:443/AC0805FR-07200KL-Yageo-datasheet-151884373.pdf?src-supplier=Future+Electronics, ComponentLink7URL=https://datasheet.octopart.com:443/AC0805FR-07200KL-Yageo-datasheet-151884373.pdf?src-supplier=Future+Electronics, ComponentLink8Description=https://datasheet.octopart.com:443/AC0805FR-07200KL-Yageo-datasheet-137699919.pdf?src-supplier=Future+Electronics, ComponentLink8URL=https://datasheet.octopart.com:443/AC0805FR-07200KL-Yageo-datasheet-137699919.pdf?src-supplier=Future+Electronics, ComponentLink9Description=https://datasheet.octopart.com:443/AC0805FR-07200KL-Yageo-datasheet-24580492.pdf?src-supplier=Future+Electronics, ComponentLink9URL=https://datasheet.octopart.com:443/AC0805FR-07200KL-Yageo-datasheet-24580492.pdf?src-supplier=Future+Electronics, ComponentLink10Description=https://datasheet.octopart.com:443/AC0805FR-07200KL-Yageo-datasheet-13029202.pdf?src-supplier=Future+Electronics, ComponentLink10URL=https://datasheet.octopart.com:443/AC0805FR-07200KL-Yageo-datasheet-13029202.pdf?src-supplier=Future+Electronics, ComponentLink11Description=https://datasheet.octopart.com:443/AC0805FR-07200KL-Yageo-Group-datasheet-164768995.pdf?src-supplier=ODG+(Origin+Data+Global), ComponentLink11URL=https://datasheet.octopart.com:443/AC0805FR-07200KL-Yageo-Group-datasheet-164768995.pdf?src-supplier=ODG+(Origin+Data+Global), ComponentLink12Description=https://datasheet.octopart.com:443/AC0805FR-07200KL-Yageo-datasheet-140571090.pdf?src-supplier=Arrow.cn, ComponentLink12URL=https://datasheet.octopart.com:443/AC0805FR-07200KL-Yageo-datasheet-140571090.pdf?src-supplier=Arrow.cn, ComponentLink13Description=http://sigma.octopart.com:80/conflict_mineral_statement/Yageo-company-3.pdf?src-supplier=Compliance+Statements, ComponentLink13URL=http://sigma.octopart.com:80/conflict_mineral_statement/Yageo-company-3.pdf?src-supplier=Compliance+Statements, ComponentLink14Description=http://sigma.octopart.com:80/rohs_statement/Yageo-company-2.pdf?src-supplier=Compliance+Statements, ComponentLink14URL=http://sigma.octopart.com:80/rohs_statement/Yageo-company-2.pdf?src-supplier=Compliance+Statements, Composition="Thick Film", Features="Automotive AEC-Q200, Moisture Resistant", Height=500µm, Lead Free="Lead Free", Length=2mm, Lifecycle Status=Production, Manufacturer Part Number=AC0805FR-07200KL, Mounting Technology="Surface Mount", Number of Terminals=2, Number of Terminations=2, Packaging="Tape & Reel", Power Rating=125mW, Pricing="1=0.1, 10=0.037, 25=0.028, 50=0.0228, 100=0.0188, 250=0.01484, 500=0.0126, 1000=0.01083 (USD)", REACH SVHC=Yes, RoHS=Compliant, Schedule B="8533210045, 8533210045|8533210045|8533210045|8533210045|8533210045", Stock=42266, Supplier=DigiKey, Termination=SMD/SMT, Width=1.25mm, Working Voltage=150V
R8 R11: library part AC0805FR-0710KL, "Res Thick Film 0805 10K Ohm 1% 0.125W(1/8W) ±100ppm/C Pad SMD Automotive T/R", Case Code (Imperial)=0805, Case Code (Metric)=2012, Manufacturer="Yageo Group", Max Operating Temperature=155°C, Max Power Dissipation=125mW, Min Operating Temperature=-55°C, Ratings=AEC-Q200, Supplier Part Number=311-10KLGCT-ND, Temperature Coefficient=100ppm/°C, Tolerance=1%, Voltage Rating=150V, Case/Package=0805, Category="Chip SMD Resistors", China RoHS=Non-Compliant, ComponentLink1Description=https://datasheet.octopart.com:443/AC0805FR-0710KL-Yageo-datasheet-182189377.pdf?src-supplier=IHS, ComponentLink1URL=https://datasheet.octopart.com:443/AC0805FR-0710KL-Yageo-datasheet-182189377.pdf?src-supplier=IHS, ComponentLink2Description=https://datasheet.octopart.com:443/AC0805FR-0710KL-Yageo-datasheet-83209224.pdf?src-supplier=Upverter, ComponentLink2URL=https://datasheet.octopart.com:443/AC0805FR-0710KL-Yageo-datasheet-83209224.pdf?src-supplier=Upverter, ComponentLink3Description=https://datasheet.octopart.com:443/AC0805FR-0710KL-Yageo-datasheet-178509465.pdf?src-supplier=Newark, ComponentLink3URL=https://datasheet.octopart.com:443/AC0805FR-0710KL-Yageo-datasheet-178509465.pdf?src-supplier=Newark, ComponentLink4Description=https://datasheet.octopart.com/AC0805FR-0710KL-Yageo-datasheet-12512238.pdf, ComponentLink4URL=https://datasheet.octopart.com/AC0805FR-0710KL-Yageo-datasheet-12512238.pdf, ComponentLink5Description=https://datasheet.octopart.com:443/AC0805FR-0710KL-Yageo-datasheet-166720450.pdf?src-supplier=Future+Electronics, ComponentLink5URL=https://datasheet.octopart.com:443/AC0805FR-0710KL-Yageo-datasheet-166720450.pdf?src-supplier=Future+Electronics, ComponentLink6Description=https://datasheet.octopart.com:443/AC0805FR-0710KL-Yageo-datasheet-151884373.pdf?src-supplier=Future+Electronics, ComponentLink6URL=https://datasheet.octopart.com:443/AC0805FR-0710KL-Yageo-datasheet-151884373.pdf?src-supplier=Future+Electronics, ComponentLink7Description=https://datasheet.octopart.com:443/AC0805FR-0710KL-Yageo-datasheet-137699919.pdf?src-supplier=Future+Electronics, ComponentLink7URL=https://datasheet.octopart.com:443/AC0805FR-0710KL-Yageo-datasheet-137699919.pdf?src-supplier=Future+Electronics, ComponentLink8Description=https://datasheet.octopart.com:443/AC0805FR-0710KL-Yageo-datasheet-24580492.pdf?src-supplier=Future+Electronics, ComponentLink8URL=https://datasheet.octopart.com:443/AC0805FR-0710KL-Yageo-datasheet-24580492.pdf?src-supplier=Future+Electronics, ComponentLink9Description=https://datasheet.octopart.com:443/AC0805FR-0710KL-Yageo-datasheet-13029202.pdf?src-supplier=Future+Electronics, ComponentLink9URL=https://datasheet.octopart.com:443/AC0805FR-0710KL-Yageo-datasheet-13029202.pdf?src-supplier=Future+Electronics, ComponentLink10Description=https://datasheet.octopart.com:443/AC0805FR-0710KL-Yageo-Group-datasheet-164768995.pdf?src-supplier=ODG+(Origin+Data+Global), ComponentLink10URL=https://datasheet.octopart.com:443/AC0805FR-0710KL-Yageo-Group-datasheet-164768995.pdf?src-supplier=ODG+(Origin+Data+Global), ComponentLink11Description=https://datasheet.octopart.com:443/AC0805FR-0710KL-Yageo-datasheet-159083007.pdf?src-supplier=TME, ComponentLink11URL=https://datasheet.octopart.com:443/AC0805FR-0710KL-Yageo-datasheet-159083007.pdf?src-supplier=TME, ComponentLink12Description=https://datasheet.octopart.com:443/AC0805FR-0710KL-Yageo-datasheet-128680559.pdf?src-supplier=X-ON, ComponentLink12URL=https://datasheet.octopart.com:443/AC0805FR-0710KL-Yageo-datasheet-128680559.pdf?src-supplier=X-ON, ComponentLink13Description=https://datasheet.octopart.com:443/AC0805FR-0710KL-Yageo-datasheet-140571090.pdf?src-supplier=Arrow.cn, ComponentLink13URL=https://datasheet.octopart.com:443/AC0805FR-0710KL-Yageo-datasheet-140571090.pdf?src-supplier=Arrow.cn, ComponentLink14Description=http://sigma.octopart.com:80/conflict_mineral_statement/Yageo-company-3.pdf?src-supplier=Compliance+Statements, ComponentLink14URL=http://sigma.octopart.com:80/conflict_mineral_statement/Yageo-company-3.pdf?src-supplier=Compliance+Statements, ComponentLink15Description=http://sigma.octopart.com:80/rohs_statement/Yageo-company-2.pdf?src-supplier=Compliance+Statements, ComponentLink15URL=http://sigma.octopart.com:80/rohs_statement/Yageo-company-2.pdf?src-supplier=Compliance+Statements, Composition="Thick Film", Depth=1.25mm, Features="Anti-Sulfur, Automotive AEC-Q200, Moisture Resistant", Height=500µm, Lead Free="Lead Free", Length=2mm, Lifecycle Status=Production, Manufacturer Part Number=AC0805FR-0710KL, Military Standard=Not, Mounting Technology="Surface Mount", Number of Terminals=2, Number of Terminations=2, Packaging="Tape & Reel", Power Rating=125mW, Pricing="1=0.1, 10=0.037, 25=0.028, 50=0.0228, 100=0.0188, 250=0.01484, 500=0.0126, 1000=0.01083 (USD)", REACH SVHC=Yes, RoHS=Compliant, Schedule B="8533210045, 8533210045|8533210045, 8533210045|8533210045|8533210045, 8533210045|8533210045|8533210045|8533210045", Stock=179739, Supplier=DigiKey, Termination=SMD/SMT, Width=1.25mm, Working Voltage=150V
R12 R14 R16 R17 R18: library part RES
U1: "Soft Sw PWM Cntrlr 2-OUT Power Supply Controller 200KHz/300KHz/400KHz/500KHz 32-Pin QFN EP", Case/Package=QFN, Frequency=500kHz, Manufacturer=Renesas, Manufacturer Lifecycle Status=OBSOLETE, Max Junction Temperature (Tj)=150°C, Max Operating Temperature=100°C, Max Output current=3.3A, Max Supply Voltage=25V, Min Input Voltage=5.5V, Min Operating Temperature=-40°C, Min Supply Voltage=4.5V, Min Switching Frequency=25kHz, Nominal Output Voltage=1.05V, Nominal Supply Voltage=12V, Output Current=20A, Supplier Part Number=ISL6236AIRZ-ND, Switching Frequency=37kHz, Temperature Grade=Industrial, Category="Voltage Regulators - Switching", ComponentLink1Description=https://datasheet.octopart.com:443/ISL6236AIRZ-Renesas-datasheet-149187364.pdf?src-supplier=Integrated+Device+Technology, ComponentLink1URL=https://datasheet.octopart.com:443/ISL6236AIRZ-Renesas-datasheet-149187364.pdf?src-supplier=Integrated+Device+Technology, ComponentLink2Description=https://datasheet.octopart.com:443/ISL6236AIRZ-Renesas-datasheet-179182849.pdf?src-supplier=Integrated+Device+Technology, ComponentLink2URL=https://datasheet.octopart.com:443/ISL6236AIRZ-Renesas-datasheet-179182849.pdf?src-supplier=Integrated+Device+Technology, ComponentLink3Description=https://datasheet.octopart.com:443/ISL6236AIRZ-Renesas-datasheet-14388266.pdf?src-supplier=IHS, ComponentLink3URL=https://datasheet.octopart.com:443/ISL6236AIRZ-Renesas-datasheet-14388266.pdf?src-supplier=IHS, ComponentLink4Description=https://datasheet.octopart.com:443/ISL6236AIRZ-Renesas-datasheet-138160199.pdf?src-supplier=Future+Electronics, ComponentLink4URL=https://datasheet.octopart.com:443/ISL6236AIRZ-Renesas-datasheet-138160199.pdf?src-supplier=Future+Electronics, ComponentLink5Description=https://datasheet.octopart.com:443/ISL6236AIRZ-Intersil-datasheet-158443858.pdf?src-supplier=Augswan, ComponentLink5URL=https://datasheet.octopart.com:443/ISL6236AIRZ-Intersil-datasheet-158443858.pdf?src-supplier=Augswan, ComponentLink6Description=http://sigma.octopart.com:80/reach_statement/Renesas-company-45.pdf?src-supplier=Compliance+Statements, ComponentLink6URL=http://sigma.octopart.com:80/reach_statement/Renesas-company-45.pdf?src-supplier=Compliance+Statements, ComponentLink7Description=http://sigma.octopart.com:80/conflict_mineral_statement/Renesas-company-44.pdf?src-supplier=Compliance+Statements, ComponentLink7URL=http://sigma.octopart.com:80/conflict_mineral_statement/Renesas-company-44.pdf?src-supplier=Compliance+Statements, Country of Origin=Taiwan, Efficiency=97%, Export Control Classification Number (ECCN) Code=EAR99, Harmonized Tariff Schedule (HTS) Code=8542.39.00.60, Height=900µm, Height - Seated (Max)=1mm, Introduction Date=2017-11-10, Lead Free="Lead Free", Length=5mm, Lifecycle Status=Obsolete, LTB Date=2025-09-04, LTD Date=2026-03-04, Manufacturer Part Number=ISL6236AIRZ, Max Switching Frequency=500kHz, Mounting Technology="Surface Mount", MSL=3, Number of Circuits=1, Number of Outputs=2, Number of Terminals=32, Output Voltage=5.5V, Part Family=ISL6236A, Pins=32, Pitch=500µm, Pricing="1=7.16, 10=5.332, 25=4.8928, 100=4.417, 490=4.0622 (USD)", Radiation Hardening=No, REACH SVHC=Yes, RoHS=Compliant, Stock=709, Supplier=DigiKey, Terminal Pitch=500µm, Topology="Buck, Push-Pull", Width=5mm

## Via types
v1: diameter 0.6, hole 0.3, L1 to L6, tented both sides, 41 vias

## Nets (pads, with @x,y where several pads share a name; then routed paths per layer and width w, separated by ;. In a path a pad name is that pad's centre, name@x,y a point inside that pad or via, vN(x,y) a via of type N, cw(c..) or ccw(c..) an arc to the next point about the centre after c; other vN are vias at no path point)
+1V05: C10.1 J4.1 L2.2 U1.30 | length 1.8
  L6 w0.2: v1(25.674,29.124) 25.75,29.049 U1.30
+1V5: C9.1 J3.1 L1.1 R12.2 U1.10 | length 6.4
  L6 w0.2: U1.10 26.265,22.585 26.265,22.246 28.161,20.35 29.583,20.35 29.7,20.233 R12.2 v1(30.8,19.55)
+5V_LDO: C1.2 R1.2 U1.7 | length 6.4
  L6 w0.2: v1(13,24.7) R1.2 ; U1.7 28.05,23.75 28.425,23.375 28.425,22.325 29.05,21.7 C1.2 v1(30.05,23.05)
+5V_PVCC: C3.1 R1.1 R2.2 R3.1 U1.19 | length 13.4
  L6 w0.2: R3.1 R2.2 R1.1 16.575,24.7 16.7,24.825 16.7,25.483 16.817,25.6 16.875,25.6 17.1,25.825 19.683,25.825 19.8,25.708 19.8,25.05 C3.1 20.2,24.65 21.147,24.65 21.647,24.15 22.144,24.15 22.229,24.235 22.585,24.235 U1.19
+5V_VCC: C4.1 R3.2 R8.2 R9.2 R10.2 R11.2 R13.2 R16.2 U1.2 U1.3 U1.20 | length 15.2